# Altium PCB John_Wollam_V2.0.PcbDoc (part 2 of 2)
Units mil, origin at the board's own origin, x right, y up, seen from the top; angles counter-clockwise.
Board outline 3783 x 2360 mil, 2 copper layers (Top Layer, Bottom Layer); 68 components, 42 nets, 236 pads, 62 vias.
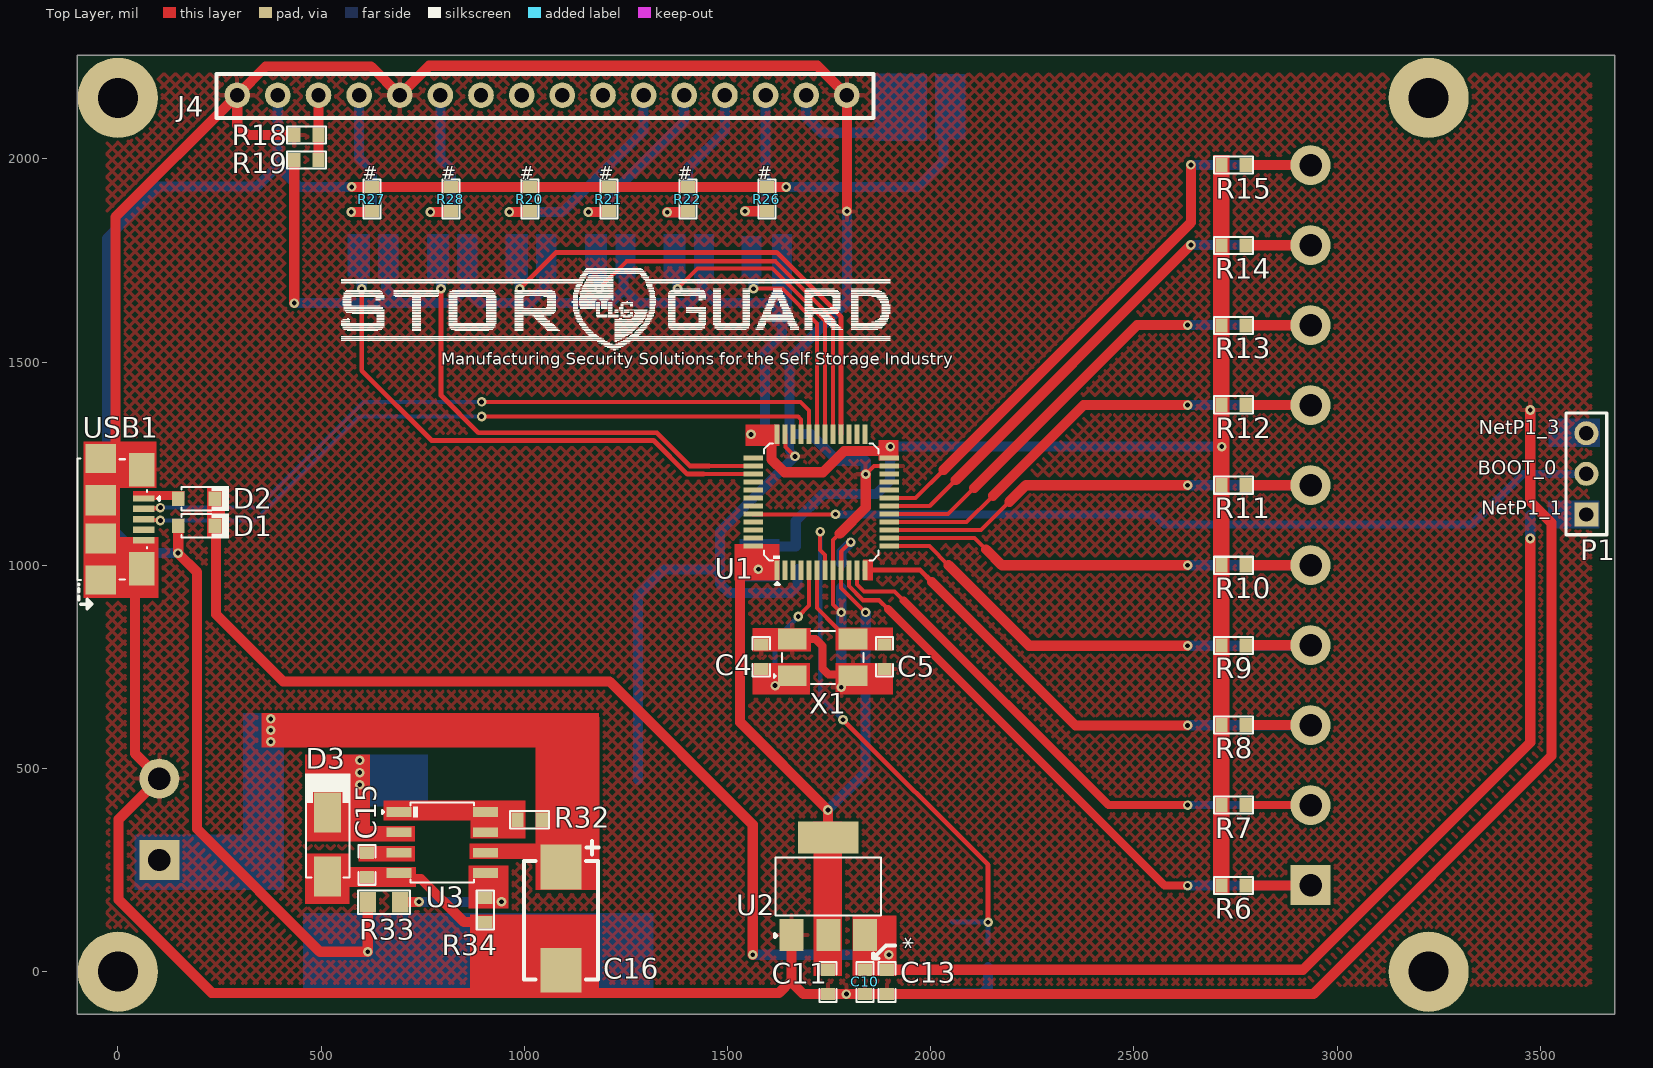
[diagram p0: Top Layer view]

## Part data (continued)
U1: "IC MCU 32BIT 128KB FLASH 48LQFP", Case/Package=LQFP, Frequency=48MHz, LCSC Part Number=C2053863, Manufacturer=STMicroelectronics, Max Operating Temperature=85°C, Min Operating Temperature=-40°C, Supplier Part Number 1=497-18745-6-ND, Category=Microcontrollers, ComponentLink1Description=http://www.mouser.com/ds/2/389/stm32f070c6-956182.pdf?src-supplier=Mouser, ComponentLink1URL=http://www.mouser.com/ds/2/389/stm32f070c6-956182.pdf?src-supplier=Mouser, ComponentLink2Description=http://www.st.com/content/ccc/resource/technical/document/datasheet/31/4f/10/5f/a5/32/46/42/DM00141386.pdf/files/DM00141386.pdf/jcr:content/translations/en.DM00141386.pdf?src-supplier=Digi-Key, ComponentLink2URL=http://www.st.com/content/ccc/resource/technical/document/datasheet/31/4f/10/5f/a5/32/46/42/DM00141386.pdf/files/DM00141386.pdf/jcr:content/translations/en.DM00141386.pdf?src-supplier=Digi-Key, Core Architecture=ARM, Interface=I2C,SPI,USB,UART,USART, Lead Free="Lead Free", Manufacturer Part Number=STM32F070CBT6TR, Memory Size=128KB, Memory Type=FLASH, Number of I/Os=37, Oscillator Type=Internal, Packaging="Tape and Reel", Peripherals=POR,PWM,WDT,DMA, Pricing 1="1=3.40000, 10=3.05100, 25=2.87800, 100=2.45200, 250=2.30232, 500=2.01452, 1000=1.91860 (USD)", RoHS=Yes, RoHS Compliant=Yes, Supplier 1=Digi-Key
U2: "IC REG LINEAR 3.3V 1.2A SOT223", Case/Package=TO-261-4, Dropout Voltage=600mV, LCSC Part Number=C435835, Manufacturer=STMicroelectronics, Max Input Voltage=18V, Max Operating Temperature=125°C, Min Operating Temperature=-40°C, Min Output Voltage=3.3V, Output Current=1.2A, Power Supply Rejection Ratio (PSRR)=65dB, Quiescent Current=500uA, Supplier Part Number 1=497-17239-6-ND, ComponentLink1Description=LCSC, ComponentLink1URL=https://www.lcsc.com/product-detail/Linear-Voltage-Regulators-LDO_STMicroelectronics-LDL1117S33R_C435835.html, Manufacturer Part Number=LDL1117S33R, Mount="Surface Mount", Number of Regulators=1, Output Configuration=Positive, Output Type=Fixed, Packaging="Tape and Reel", Pricing 1="1=0.45, 10=0.362, 100=0.2465, 500=0.1849, 1000=0.13867 (USD)", Stock 1=13064, Supplier 1=Digi-Key
U3: "IC REG BUCK BST ADJ 1.5A 8SOIC", Case/Package=D, LCSC Part Number=C100023, Manufacturer="Texas Instruments", Max Input Voltage=40V, Max Operating Temperature=70°C, Max Output Current=750mA, Min Input Voltage=3V, Min Operating Temperature=0°C, Min Output Voltage=1.55V, Output Current=1.5A, Package Quantity=1, Quiescent Current=4mA, Supplier Part Number 1=296-17765-1-ND, Switching Frequency=100kHz, Category="Power Supply Modules", ComponentLink1Description=https://datasheet.ciiva.com/7408/1862376-7408060.pdf?src-supplier=Newark, ComponentLink1URL=https://datasheet.ciiva.com/7408/1862376-7408060.pdf?src-supplier=Newark, ComponentLink2Description=https://datasheet.ciiva.com/2025/mc33063a-2025162.pdf?src-supplier=Digi-Key, ComponentLink2URL=https://datasheet.ciiva.com/2025/mc33063a-2025162.pdf?src-supplier=Digi-Key, ComponentLink3Description=https://datasheet.ciiva.com/2025/mc33063a-2025161.pdf?src-supplier=Digi-Key, ComponentLink3URL=https://datasheet.ciiva.com/2025/mc33063a-2025161.pdf?src-supplier=Digi-Key, ComponentLink4Description=https://datasheet.ciiva.com/2025/mc33063a-2025163.pdf?src-supplier=Digi-Key, ComponentLink4URL=https://datasheet.ciiva.com/2025/mc33063a-2025163.pdf?src-supplier=Digi-Key, Contact Plating=Gold, Lead Free="Lead Free", Manufacturer Part Number=MC34063ADR, Max Output Voltage=40V, Number of Outputs=1, Number of Pins=8, Output Type=Adjustable, Output Voltage=40V, Packaging="Tape and Reel", Pricing 1="1=0.78000, 10=0.68400, 25=0.64240, 100=0.52420, 250=0.48688, 500=0.41438, 1000=0.34206 (USD)", Radiation Hardening=No, REACH SVHC="No SVHC", RoHS=Yes, RoHS Compliant=Yes, Stock 1=17204, Supplier 1=Digi-Key, Synchronous Rectifier=No, Termination=SMD/SMT, Topology=Flyback,SEPIC, Weight=0.002561oz
USB1: "CONN RCPT USB2.0 MICRO B SMD R/A", Color=Black, Current Rating=1.8A, Flammability Rating="UL94 V-0", Insulation Resistance=1GR, LCSC Part Number=C132564, Manufacturer="Amphenol FCI", Max Operating Temperature=85°C, Max Voltage Rating (AC)=100V, Min Operating Temperature=-55°C, Package Quantity=1400, Supplier Part Number 1=609-4613-6-ND, ComponentLink1Description=https://cdn.amphenol-icc.com/media/wysiwyg/files/documentation/datasheet/inputoutput/io_usb_micro.pdf?src-supplier=Verical, ComponentLink1URL=https://cdn.amphenol-icc.com/media/wysiwyg/files/documentation/datasheet/inputoutput/io_usb_micro.pdf?src-supplier=Verical, ComponentLink2Description=http://www.amphenol-icc.com/media/wysiwyg/files/drawing/10118192.pdf?src-supplier=Digi-Key, ComponentLink2URL=http://www.amphenol-icc.com/media/wysiwyg/files/drawing/10118192.pdf?src-supplier=Digi-Key, ComponentLink3Description=https://cdn.amphenol-icc.com/media/wysiwyg/files/documentation/datasheet/inputoutput/io_usb_micro.pdf?src-supplier=Mouser, ComponentLink3URL=https://cdn.amphenol-icc.com/media/wysiwyg/files/documentation/datasheet/inputoutput/io_usb_micro.pdf?src-supplier=Mouser, Connector Type=USB,Receptacle, Contact Material="Copper Alloy", Contact Plating=Gold, Depth=5.57mm, Features=Shielded, Gender=Receptacle, Housing Material=Polymer, Lead Free="Lead Free", Length=7.86mm, Manufacturer Part Number=10118192-0001LF, Mount="Surface Mount,Horizontal", Number of Contacts=5, Number of Ports=1, Number of Terminals=5, Orientation="Right Angle", Packaging="Tape and Reel", Pitch=0.65mm, Pricing 1="1=0.43, 10=0.405, 25=0.3648, 50=0.3242, 100=0.3107, 250=0.28368, 500=0.27016 (USD)", Radiation Hardening=No, REACH SVHC="No SVHC", Stock 1=32977, Supplier 1=Digi-Key, Termination=Solder, USB Standard="USB 2.0", Voltage Rating=100V
X1: library part 5TJ480000XYLBC, "8MHz SMD Crystal Resonator 18pF 70Ω ±10ppm ±30ppm -40℃~+85℃ SMD5032-4P Crystals ROHS", LCSC Part Number=C2149247, Manufacturer=JYJE, ComponentLink1Description=LCSC, ComponentLink1URL=https://lcsc.com/product-detail/Crystals_JYJE-5TJ480000XYLBC_C2149247.html, Manufacturer Part Number=5TJ480000XYLBC

## Free pads (board coordinates)
  round 196.85 hole 98.43: MH(0,0) MH(0,2150) MH(3225,0) MH(3225,2150)

## Via types
v1: diameter 23.62, hole 11.81, Top Layer to Bottom Layer, tented both sides, 62 vias

## Nets (pads, with @x,y where several pads share a name; then routed paths per layer and width w, separated by ;. In a path a pad name is that pad's centre, name@x,y a point inside that pad or via, vN(x,y) a via of type N, cw(c..) or ccw(c..) an arc to the next point about the centre after c; other vN are vias at no path point)
3V3: C1.1 C2.1 C3.1 C6.1 C7.1 C8.1 C11.1 C14.1 Q2.1 Q4.1 Q5.1 Q6.1 Q7.1 Q8.1 R6.2 R7.2 R8.2 R9.2 R10.2 R11.2 R12.2 R13.2 R14.2 R15.2 R17.2 R19.2 R23.2 R24.2 R25.2 R29.2 R30.2 R31.2 U1.1 U1.9 U1.24 U1.36 U1.48 U2.2 U2.4 | length 5954.3
  Top Layer w10: v1(1803,1057) 1779.78,1033.78 1779.78,988.37 U1.9 1779.57,944.22 v1(1839.78,884)
  Top Layer w25: v1(434,1645) R19.2 ; v1(1576.08,990.06) 1545.56,990.06 1531,975.5 1531,614 v1(1747,398) 1747,330.08 1747,254 1757,244 ; v1@1579.54,986.6 1583,990.06 1583,1008 ; 1607.96,1313 1607.96,1261.04 1640,1229 1735,1229 1787.28,1281.28 1884.72,1281.28 1888,1278 ; C11.1 1747.5,5.5 1747.5,89.42 U2.2 ; 1747,180 1747,244
  Bottom Layer w25: v1(434,1645) 696,1645 ; R30.2 660,1681 696,1645 ; R31.2 855,1680 ; R23.2 1049,1680 ; 1243,1676 1212,1645 1084,1645 1049,1680 ; 1249,1760 1249,1735 R24.2 1244,1680 1279,1645 1407,1645 1438,1676 ; 1442,1760 1442,1734 1438,1730 1438,1680 1473,1645 1627,1645 ; v1(1557.78,1322) C1.1@1590.29,1322 ; C1.1@1590.29,1321 C1.1 1592.09,1526.09 1634,1568 1634,1600 ; 1611,1046 R17.2 1668,1109 1734,1175 1866,1175 1900,1209 C2.1 1900.78,1257.78 v1(1900.78,1292) v1(2716,1292) ; 1624,1668 R29.2 ; v1(1747,398) 1839.78,490.78 C7.1@1839.78,790 ; C14.1 1781.14,1005 C14.1@1783.64,1007.5 ; C14.1@1780.64,1007.5 1780.64,1033.9 v1@1803,1056.26 ; C8.1@1839.78,845 v1(1839.78,884) ; C7.1 C8.1 v1@1840,884 ; 696,1645 820,1645 855,1680 ; 855,1680 890,1645 1014,1645 1049,1680
#DB4_: Q2.2 R23.1 U1.28 | length 1231.5
  Top Layer w12: v1(989,1680.6) 1078.4,1770 1621,1770 1779.57,1611.43 U1.28
  Bottom Layer w25: v1(989,1680.6) R23.1 R23.1@989,1730.23
#DB5_: Q4.2 R24.1 U1.29 | length 995.3
  Top Layer w10: v1(1184,1680.6) 1251.4,1748 1617.54,1748 1759.88,1605.66 U1.29
  Bottom Layer w25: v1(1184,1680.6) R24.1 R24.1@1184,1730.23
#DB6_: Q5.2 R25.1 U1.30 | length 764.8
  Top Layer w10: v1(1377,1680.6) 1426.4,1730 1611,1730 1740.2,1600.8 U1.30
  Bottom Layer w25: v1(1377,1680.6) R25.1 R25.1@1377,1730.23
#DB7_: Q6.2 R29.1 U1.31 | length 520.9
  Top Layer w10: v1(1564,1680.6) 1634.94,1680.6 1720.51,1595.03 U1.31
  Bottom Layer w20: R29.1@1559,1725 R29.1
  Bottom Layer w25: v1(1564,1680.6) R29.1 R29.1@1564,1730.23
#EN_: Q8.2 R31.1 U1.38 | length 1152.3
  Top Layer w10: 1455,1244.05 U1.38
  Top Layer w12: v1(795,1680.6) 795,1418 887,1326 1326.13,1326 1408.08,1244.05 1455,1244.05
  Bottom Layer w25: v1(795,1680.6) R31.1 R31.1@795,1730.23
#RS_: Q7.2 R30.1 U1.39 | length 1319.7
  Top Layer w10: 1441,1224.37 U1.39
  Top Layer w12: v1(600,1680.6) 600,1479 772,1307 1318.26,1307 1400.89,1224.37 1441,1224.37
  Bottom Layer w25: v1(600,1680.6) R30.1 R30.1@600,1730.23
BOOT0_: P1.2 U1.44 | length 2112.3
  Top Layer w10: U1.44 1563.5,1125.47 v1(1765.78,1125.47)
  Bottom Layer w20: v1@1765.78,1125 2549.56,1125 2574.56,1100 3332,1100 3457,1225 P1.2
CII: R33.1 R34.1 U3.5 | length 249.4
  Top Layer w25: R33.1 696,172 v1(741,172)
  Bottom Layer w25: v1(741,172) v1(944,172)
D+: U1.33 USB1.3 | length 1764
  Top Layer w10: USB1.3 64.82,1111.74 103.33,1111.74 v1(104.83,1110.24) ; v1(895,1366) 1673.96,1366 1681.14,1358.82 U1.33
  Bottom Layer w10: v1(104.83,1110.24) 337.24,1110.24 593,1366 v1(895,1366)
D-: U1.32 USB1.2 | length 1813.5
  Top Layer w10: USB1.2 64.82,1140.33 103.33,1140.33 v1(104.83,1141.83) ; v1(895,1402) 1680,1402 1700.83,1381.17 U1.32
  Bottom Layer w10: v1(104.83,1141.83) 343.83,1141.83 604,1402 v1(895,1402)
DB4_: J4.11 Q2.3 R20.1 | length 552.3
  Top Layer w25: v1(963.3,1869.1) R20.1@1011.9,1869.1
  Bottom Layer w25: v1(963.3,1869.1) Q2.3@1012.93,1869.1 ; Q2.3@1010,1869.37 1094.37,1869.37 1293.6,2068.6 J4.11
DB5_: J4.12 Q4.3 R21.1 | length 461.4
  Top Layer w25: v1(1157.7,1869.1) R21.1@1206.3,1869.1
  Bottom Layer w25: v1(1157.7,1869.1) Q4.3@1207.33,1869.1 ; Q4.3@1210,1869.37 1210,1909 1392.5,2091.5 1392.5,2155.4 J4.12
DB6_: J4.13 Q5.3 R22.1 | length 428.1
  Top Layer w25: v1(1351.5,1868.5) 1400.1,1868.5 R22.1
  Bottom Layer w25: v1(1351.5,1868.5) 1401.13,1868.5 Q5.3 1402,1977 1493.6,2068.6 J4.13
DB7_: J4.14 Q6.3 R26.1 | length 386.8
  Top Layer w25: v1(1543.1,1870.87) R26.1@1591.7,1870.87
  Bottom Layer w25: v1(1543.1,1870.87) Q6.3@1592.73,1870.87 ; Q6.3@1590.6,1872.77 Q6.3 ; Q6.3@1593.6,1872.77 J4.14
EN_: J4.6 Q8.3 R28.1 | length 396.3
  Top Layer w25: v1(768.9,1869.1) R28.1@817.5,1869.1
  Bottom Layer w25: v1(768.9,1869.1) Q8.3@818.53,1869.1 ; J4.6 793.6,2000.4 820,1974 Q8.3
GND: C1.2 C2.2 C3.2 C4.1 C5.1 C6.2 C7.2 C8.2 C9.1 C10.2 C11.2 C13.2 C14.2 C15.1 C16.2 C17.2 D3.2 J3.2 J4.1 J4.5 J4.16 R2.2 R18.1 R34.2 SW1.2 U1.8 U1.23 U1.35 U2.1 U3.4 USB1.5 USB1.MP1 USB1.MP2 USB1.MP3 USB1.MP4 USB1.MP5 USB1.MP6 X1.2 X1.4 | length 12870.1
  Top Layer w10: U1.35 1643.07,1321.5 1643.07,1290.93 v1(1666,1268) ; 1776,1078 1759.88,1061.88 U1.8 1759.88,903.9 v1(1779.78,884) ; v1(1840,1224) 1860.05,1244.05 U1.23
  Top Layer w20: X1.4@1662.17,818.31 1716.69,818.31 1734,801 1734,746 1748.31,731.69 X1.2@1807.83,731.69
  Top Layer w25: USB1.MP3@-43,962.64 USB1.MP3 ; USB1.MP6 -40.03,1262.85 -17.1,1285.78 -17.1,1287.75 -6,1298.85 -6,1856.9 J4.1 ; 24,978 42,978 42,537.63 102,477.63 J3.2 2,375 2,177 231,-52 1025.5,-52 1627,-52 1657.45,-21.55 ; USB1.MP2 61,988.59 USB1.MP2@61,978 ; R18.1 318,2059 293.6,2083.4 J4.1 ; U3.4 706.56,228.14 745.86,228.14 852,122 R34.2 ; U2.1 1657.45,-21.55 ; 1776,1078 1840,1142 v1(1840,1224) ; v1(1793.6,1870.87) J4.16 1721.1,2229 766.1,2229 J4.5 623.1,2227 364.1,2227 J4.1 ; v1(3475,1382) 3475,1157 3527,1105 3527,531 2941,-55 C13.2 C10.2 v1(1792.5,-55) C11.2 1687,-55 1657.45,-25.45 1657.45,-21.55
  Bottom Layer w22: C1.2@1654.59,1320.29 1654.59,1318.88 1652,1316.29 1652,1282 v1(1666,1268)
  Bottom Layer w25: C17.2@1280,472 1280,926 1343.91,989.91 C3.2@1481.21,989.91 ; C1.2@1654.59,1320.29 C1.2 ; v1(1666,1268) 1481.21,1083.21 C3.2@1481.21,989.91 ; C6.2 1671.77,947.77 1656,932 1504,932 1481.21,954.79 C3.2@1481.21,989.91 ; v1(1780,700) C7.2 C8.2 C14.2 ; v1(1792.5,-55) SW1.2@2052.57,-55 ; v1(1793.6,1870.87) 1793.6,1648.6 1652.09,1507.09 C1.2 ; v1(1840,1224) C2.2 1770.38,1257 1704.59,1322.79 C1.2 ; SW1.2 2125.42,-53.58 2141,-38 C9.1 ; R2.2 v1(3475,1382)
"IPK SNS": R32.1 U3.1 U3.7 U3.8 | length 212.6
  Top Layer w20: U3.1 U3.8
Message_1: J1.1 R6.1 U1.10 | length 1641.5
  Top Layer w10: U1.10 1799.25,948.57 1833.82,914 1873,914 1895,892
  Top Layer w20: 1895,892 2575,212 v1(2632,212)
  Top Layer w25: R6.1 2933.65,212 J1.1 ; J1.1@2934,185 J1.1@2935,184
  Bottom Layer w25: v1(2632,212) 2933.65,212 J1.1
Message_2: J1.2 R7.1 U1.11 | length 1542.1
  Top Layer w10: U1.11 1818.94,952.93 1835.87,936 1911,936 1933.5,913.5
  Top Layer w20: 1933.5,913.5 2437,410 v1(2632,410) ; R7.1 2775.15,409.85 2934.35,409.85 J1.2
  Top Layer w25: J1.2@2929.8,405 J1.2
  Bottom Layer w20: v1(2632,410) 2632.15,409.85 2934.35,409.85 J1.2
Message_3: J1.3 R8.1 U1.12 | length 1414.1
  Top Layer w12: U1.12 1973.85,988.15 2003,959
  Top Layer w25: 2003,959 2356,606 v1(2632,606) ; R8.1 2775.23,606.77 2934.27,606.77 J1.3
  Bottom Layer w25: v1(2632,606) 2632.27,606.27 2934.23,606.27 J1.3
Message_4: J1.4 R9.1 U1.13 | length 1296.7
  Top Layer w10: U1.13 1996.8,1047.2 2044,1000
  Top Layer w25: 2044,1000 2242,802 v1(2632,802) ; R9.1 2775.2,803.2 2934.3,803.2 J1.4
  Bottom Layer w25: v1(2632,802) J1.4@2933.1,802
Message_5: J1.5 R10.1 U1.14 | length 1224.2
  Top Layer w8: R10.1 R10.1@2775.25,1000.25
  Top Layer w10: U1.14 2108.11,1066.89 2136.31,1038.69
  Top Layer w25: 2136.31,1038.69 2175,1000 v1(2632,1000) ; R10.1@2775.25,1000.25 J1.5
  Bottom Layer w25: v1(2632,1000) 2632.12,1000.12 2934.38,1000.12 J1.5
Message_6: J1.6 R11.1 U1.15 | length 1242
  Top Layer w10: U1.15 2123.57,1086.57 2193.48,1156.48
  Top Layer w25: 2193.48,1156.48 2234,1197 v1(2632,1197) ; R11.1 R11.1 2934.45,1197.05 J1.6
  Bottom Layer w25: v1(2632,1197) J1.6@2934.4,1197
Message_7: J1.7 R12.1 U1.16 | length 1315.9
  Top Layer w10: U1.16 2088.26,1106.26 2153,1171
  Top Layer w25: 2153,1171 2376,1394 v1(2632,1394) ; R12.1 2775.53,1394.47 2933.97,1394.47 J1.7
  Bottom Layer w25: v1(2632,1394) J1.7@2934.45,1394
Message_8: J1.8 R13.1 U1.17 | length 1389.4
  Top Layer w10: U1.17 2042.94,1125.94 2107,1190
  Top Layer w25: 2107,1190 2508,1591 v1(2632,1591) ; R13.1 2775.4,1590.4 2934.1,1590.4 J1.8
  Bottom Layer w25: v1(2632,1591) 2632.1,1590.9 2934.4,1590.9 J1.8
Message_9: J1.9 R14.1 U1.18 | length 1462.7
  Top Layer w10: U1.18 1997.55,1145.63 2061.5,1209.58
  Top Layer w25: 2061.5,1209.58 v1(2640,1788.08) ; R14.1 2775.32,1787.32 2934.18,1787.32 J1.9
  Bottom Layer w25: v1@2640,1787.65 J1.9
Message_10: J1.10 R15.1 U1.19 | length 1618.7
  Top Layer w10: U1.19 1962.31,1165.31 2032,1235
  Top Layer w25: 2032,1235 2640,1843 v1(2640,1985) ; R15.1@2775.5,1984.5 J1.10 J1.10@2935,1984
  Bottom Layer w25: v1(2640,1985) J1.10@2934,1985
NetC15_2: C15.2 U3.3 | length 78.7
  Top Layer w20: C15.2 U3.3
NetD3_1: D3.1 L1.1 U3.2 | length 80.8
  Top Layer w20: D3.1@511.38,366.62 525.37,366.62 D3.1@548.99,343
  Bottom Layer w25: v1@594,467 595,468 v1@595,500
  other v1: 595,460 595,490 595,520
NetP1_1: P1.1 R1.1 | length 78.8
  Bottom Layer w25: R1.1 3536,1124 3612,1124 P1.1
NetP1_3: P1.3 R2.1 | length 78
  Bottom Layer w25: R2.1 P1.3
RESET_: C9.2 R17.1 SW1.4 U1.7 | length 1372.1
  Top Layer w10: v1(1728,1083) 1728,1037.2 1740.2,1025 U1.7
  Top Layer w12: v1(1784,620) 2141,263 v1(2141,122)
  Bottom Layer w12: v1(1728,1083) R17.1 1728,676 v1(1784,620) ; SW1.4 2054.15,122 v1(2141,122) C9.2
RS_: J4.4 Q7.3 R27.1 | length 398.4
  Top Layer w25: v1(574.5,1869.1) R27.1@623.1,1869.1
  Bottom Layer w25: v1(574.5,1869.1) Q7.3@624.13,1869.1 ; J4.4 593.6,2001.4 625,1970 Q7.3
V0: J4.3 R18.2 R19.1 | length 159.7
  Top Layer w25: J4.3 493.8,2156.3 493.8,1997.2 R19.1
VBUS: C17.1 D1.2 J4.2 L1.2 R4.2 R20.2 R21.2 R22.2 R26.2 R27.2 R28.2 R33.2 SB1.1 | length 6390.3
  Top Layer w25: v1(148,1030) 195,983 195,351 497,49 v1(615,49) R33.2 ; v1@148.72,1030 D1.2 ; v1(575.37,1931) R27.2@623.97,1931 ; R27.2 R28.2 R20.2 R21.2 R22.2 1591.5,1931 1594.5,1928 R26.2@1597,1928 ; R26.2@1595.5,1930.8 v1(1644.1,1930.8)
  Bottom Layer w25: v1(148,1030) 45,1030 -27,1102 -27,1804 101,1932 343.2,1932 393.6,1982.4 ; J4.2 393.6,1982.4 ; v1(575.37,1931) 445,1931 393.6,1982.4 ; v1(615,49) 1211.58,49 ; L1.2@705,49.02 1222.58,49.02 ; L1.2@733,49.02 1239.58,49.02 ; v1(1644.1,1930.8) 1967.8,1930.8 2031,1994 SB1.1
VCC: C10.1 C13.1 D1.1 D2.1 R1.2 U2.3 | length 4876.4
  Top Layer w25: D1.1 241.5,1094.78 241.5,879.5 407,714 1210,714 1562,362 v1(1562,42) ; C10.1@1837,5 1837.78,5.78 1837.78,89.15 U2.3 ; C13.1@1883,5 C13.1 2916,5 3475,564 v1(3475,1066)
  Bottom Layer w25: v1(1562,42) v1(1897,42) ; v1(3475,1066) R1.2
VCC_12V: C16.1 J3.1 R32.2 U3.6 | length 1054.4
  Top Layer w25: v1@376,614 948,614 ; U3.6 C16.1@1065,293 ; R32.2 1046,377 1046,516
  Bottom Layer w25: J3.1 279,275 ; v1@375,613 v1@376,614
  other v1: 376,566 376,594 376,622
VCCBL_: J4.15 R4.1 SB1.2 | length 399.2
  Bottom Layer w25: J4.15 1693.6,2102.4 1732,2064 1874.5,2064 1900.5,2090 1900.5,2125 ; 1891.75,2084.75 1909.25,2084.75 1951,2126.5
VUSB: D2.2 USB1.1 | length 75
  Top Layer w12: USB1.1@63.53,1164.21 USB1.1 USB1.1@63.6,1164.71 ; USB1.1@63.53,1167.21 D2.2@137.51,1167.21 ; D2.2@137.51,1164.21 D2.2@137.72,1164
X1_: C4.2 U1.5 X1.1 | length 318.9
  Top Layer w10: v1(1674,874) 1700.83,900.83 1700.83,930.83 U1.5
  Bottom Layer w12: v1(1617,704) 1617,817 v1(1674,874)
X2_: C5.2 U1.6 X1.3 | length 249.6
  Top Layer w10: U1.6 1720.51,894.49 1767.43,847.57 1771,844 1771,841.61 1794.31,818.31 X1.3@1843.5,818.31
pads on no net: J4.7 J4.8 J4.9 J4.10 SW1.1 SW1.3 U1.2 U1.3 U1.4 U1.20 U1.21 U1.22 U1.25 U1.26 U1.27 U1.34 U1.37 U1.40 U1.41 U1.42 U1.43 U1.45 U1.46 U1.47 USB1.4

## Polygon pours and split planes (outlines as drawn)
GND on Top Layer "GND_L01_P000" (hatched 45Degree grid 20 track 8, remove dead copper, pour order 0): -26,2208 3624,2208 3624,-34 -26,-34
GND on Bottom Layer "GND_L02_P001" (hatched 45Degree grid 20 track 8, remove dead copper, pour order 1): -26,2208 3624,2208 3624,-34 -26,-34

## Other copper
Top Layer:
  rectangle net CII: 863,155 961,262
  rectangle net GND: 461,167.27 569.45,291.52
  rectangle net VCC_12V: 353,552 1184,636
  rectangle net Message_3: 1833,963 1858,1014
  region net VCC_12V: 1065,315 865,315 865,277 1065,277
  region net GND: 1184,141 867,141 867,-65 1184,-65
  region net VCC_12V: 1185,200.7 1185,627 1027,627 1027,200.7
  rectangle net NetC15_2: 592,271 731,309
  rectangle net NetD3_1: 460,321 731,359
  rectangle net "IPK SNS": 654,372 1003,421
  rectangle net NetD3_1: 461,324.75 621,535
  rectangle net X1_: 1562,682 1703,760
  region net GND: 1907,760 1766,760 1766,682 1907,682
  rectangle net 3V3: 1871.35,1258 1921,1308
  rectangle net VCC: 1808,-10.14 1916,138
  rectangle net VUSB: 37,1161.74 164,1183
  rectangle net 3V3: 1544,1293 1627.96,1347
  rectangle net 3V3: 1517,963 1628,1053
  region net X2_: 1907,846.61 1766,846.61 1766,790 1907,790
  rectangle net GND: 1562,788 1705,846
  rectangle net GND: 462,208 734,258
  rectangle net VCC: 219,1070 264,1195
  rectangle net "IPK SNS": 868,328 1003,413
  rectangle net 3V3: 1712,-10 1782,370
  rectangle net GND: -85,1190 95,1305
  rectangle net GND: -20,920 100,1070
  rectangle net GND: -85,920 5,1305
  rectangle net 3V3: 2695,189 2735,2010
Bottom Layer:
  rectangle net VBUS: 456,-62 1318,144
  rectangle net VCC_12V: 308,201 409,636
  rectangle net VCC_12V: 41,201 391,338
  rectangle net NetD3_1: 570,406 763,534
  rectangle net NetP1_3: 3520,1291 3646,1361
  rectangle net #DB7_: 1534,1710 1584,1810
  rectangle net NetP1_1: 3519,1090 3645,1160
  rectangle net 3V3: 1529,960 1628.03,1065
  rectangle net VBUS: 2011,2047 2086,2209
  rectangle net VCCBL_: 1862,2044 1939,2210
  rectangle net VCCBL_: 1911,2044 1991,2209
  rectangle net #DB6_: 1342.2,1705 1397,1815
  rectangle net 3V3: 1609,1587 1659,1815
  rectangle net 3V3: 1417,1705 1467,1815
  rectangle net 3V3: 1224,1705 1274,1815
  rectangle net #DB5_: 1149.2,1705 1204,1815
  rectangle net 3V3: 1029,1705 1079,1815
  rectangle net #DB4_: 954.2,1705 1009,1815
  rectangle net #EN_: 760.2,1705 815,1815
  rectangle net 3V3: 835,1705 885,1815
  rectangle net 3V3: 640,1705 690,1815
  rectangle net #RS_: 565,1710 620,1815
  pour cut-out: 432,544 443,544 956,544 956,-74 432,-74

## Silkscreen, mask and mechanical layers (free items; w line width, h text height)
Top Overlay:
  drawing of 712 lines, arcs and shapes, not listed
  text "#" at 1610,1993.41 h55 r180
  text "#" at 639,1992.41 h55 r180
  text "#" at 833,1992.41 h55 r180
  text "#" at 1026,1992.41 h55 r180
  text "#" at 1220,1992.41 h55 r180
  text "#" at 1414,1992.41 h55 r180
  text "Manufacturing Security Solutions for the Self Storage Industry" at 796,1484 h50
  text "NetP1_3" at 3348,1310.59 h60
  text "BOOT_0" at 3346,1210.59 h60
  text "NetP1_1" at 3355,1111.59 h60
  text "*" at 1898.09,55 h75 r270
Bottom Overlay:
  drawing of 3762 lines, arcs and shapes, not listed
  text "Messeage_10" at 2763.97,1976 h90
  text "Messeage_9" at 2764.66,1774 h90
  text "#" at 547,1747.41 h55 r180
  text "#" at 742,1747.41 h55 r180
  text "#" at 936,1747.41 h55 r180
  text "#" at 1324,1747.41 h55 r180
  text "#" at 1511,1747.41 h55 r180
  text "#" at 1131,1745.41 h55 r180
  text "Messeage_8" at 2764.75,1577 h90
  text "Manufacturing Security Solutions for the Self Storage Industry" at 1578,1397 h50
  text "Messeage_7" at 2764.75,1384.09 h90
  text "*" at 1691.91,1352 h75 r90
  text "*" at 1940.91,1204 h75 r90
  text "Messeage_6" at 2765.1,1182 h90
  text "Messeage_5" at 2764.32,986.09 h90
  text "*" at 1581.91,937 h75 r90
  text "*" at 1712.91,937 h75 r90
  text "Messeage_4" at 2763.63,784 h90
  text "ZERO CARBON FOOTPRINT" at 1191,701 h45
  text "Messeage_3" at 2763.84,588 h90
  text "VCC_12V" at 309,583 h75
  text "Messeage_2" at 2763.53,387 h90
  text "Messeage_1" at 2762.05,188 h90
  text "Reset_Switch" at 2098,161 h50
  text "GND" at 309,110 h75
  text "Note:" at 422.82,33.5 h75
  text "*" at 2217.91,-4 h75 r90
  text "*>> 0.1uF" at 427.82,-34.75 h75
  text "#>> 10K" at 427.82,-97.39 h75
Mechanical 2:
  lines w10: -100,-105 -100,738.49 -100,1049.51 -100,2255 3325,2255 3683,2255 3683,-105 3325,-105 -100,-105

## Dimensions
-100,2255 to -100,-105 on Mechanical 1
-100,2255 to 3683,2255 on Mechanical 1